# Altium PCB Phaser.PcbDoc (part 10 of 16)
Units mm, origin at the board's own origin, x right, y up, seen from the top; angles counter-clockwise.
Board outline 161.99 x 100 mm, 6 copper layers (TopLayer, MidLayer1, MidLayer2, SignalLayer1, Internal Plane 1, BottomLayer), stack 1.528 mm thick; 1017 components, 665 nets, 3453 pads, 2223 vias.
Unrouted connection lines stored in the file: 1.
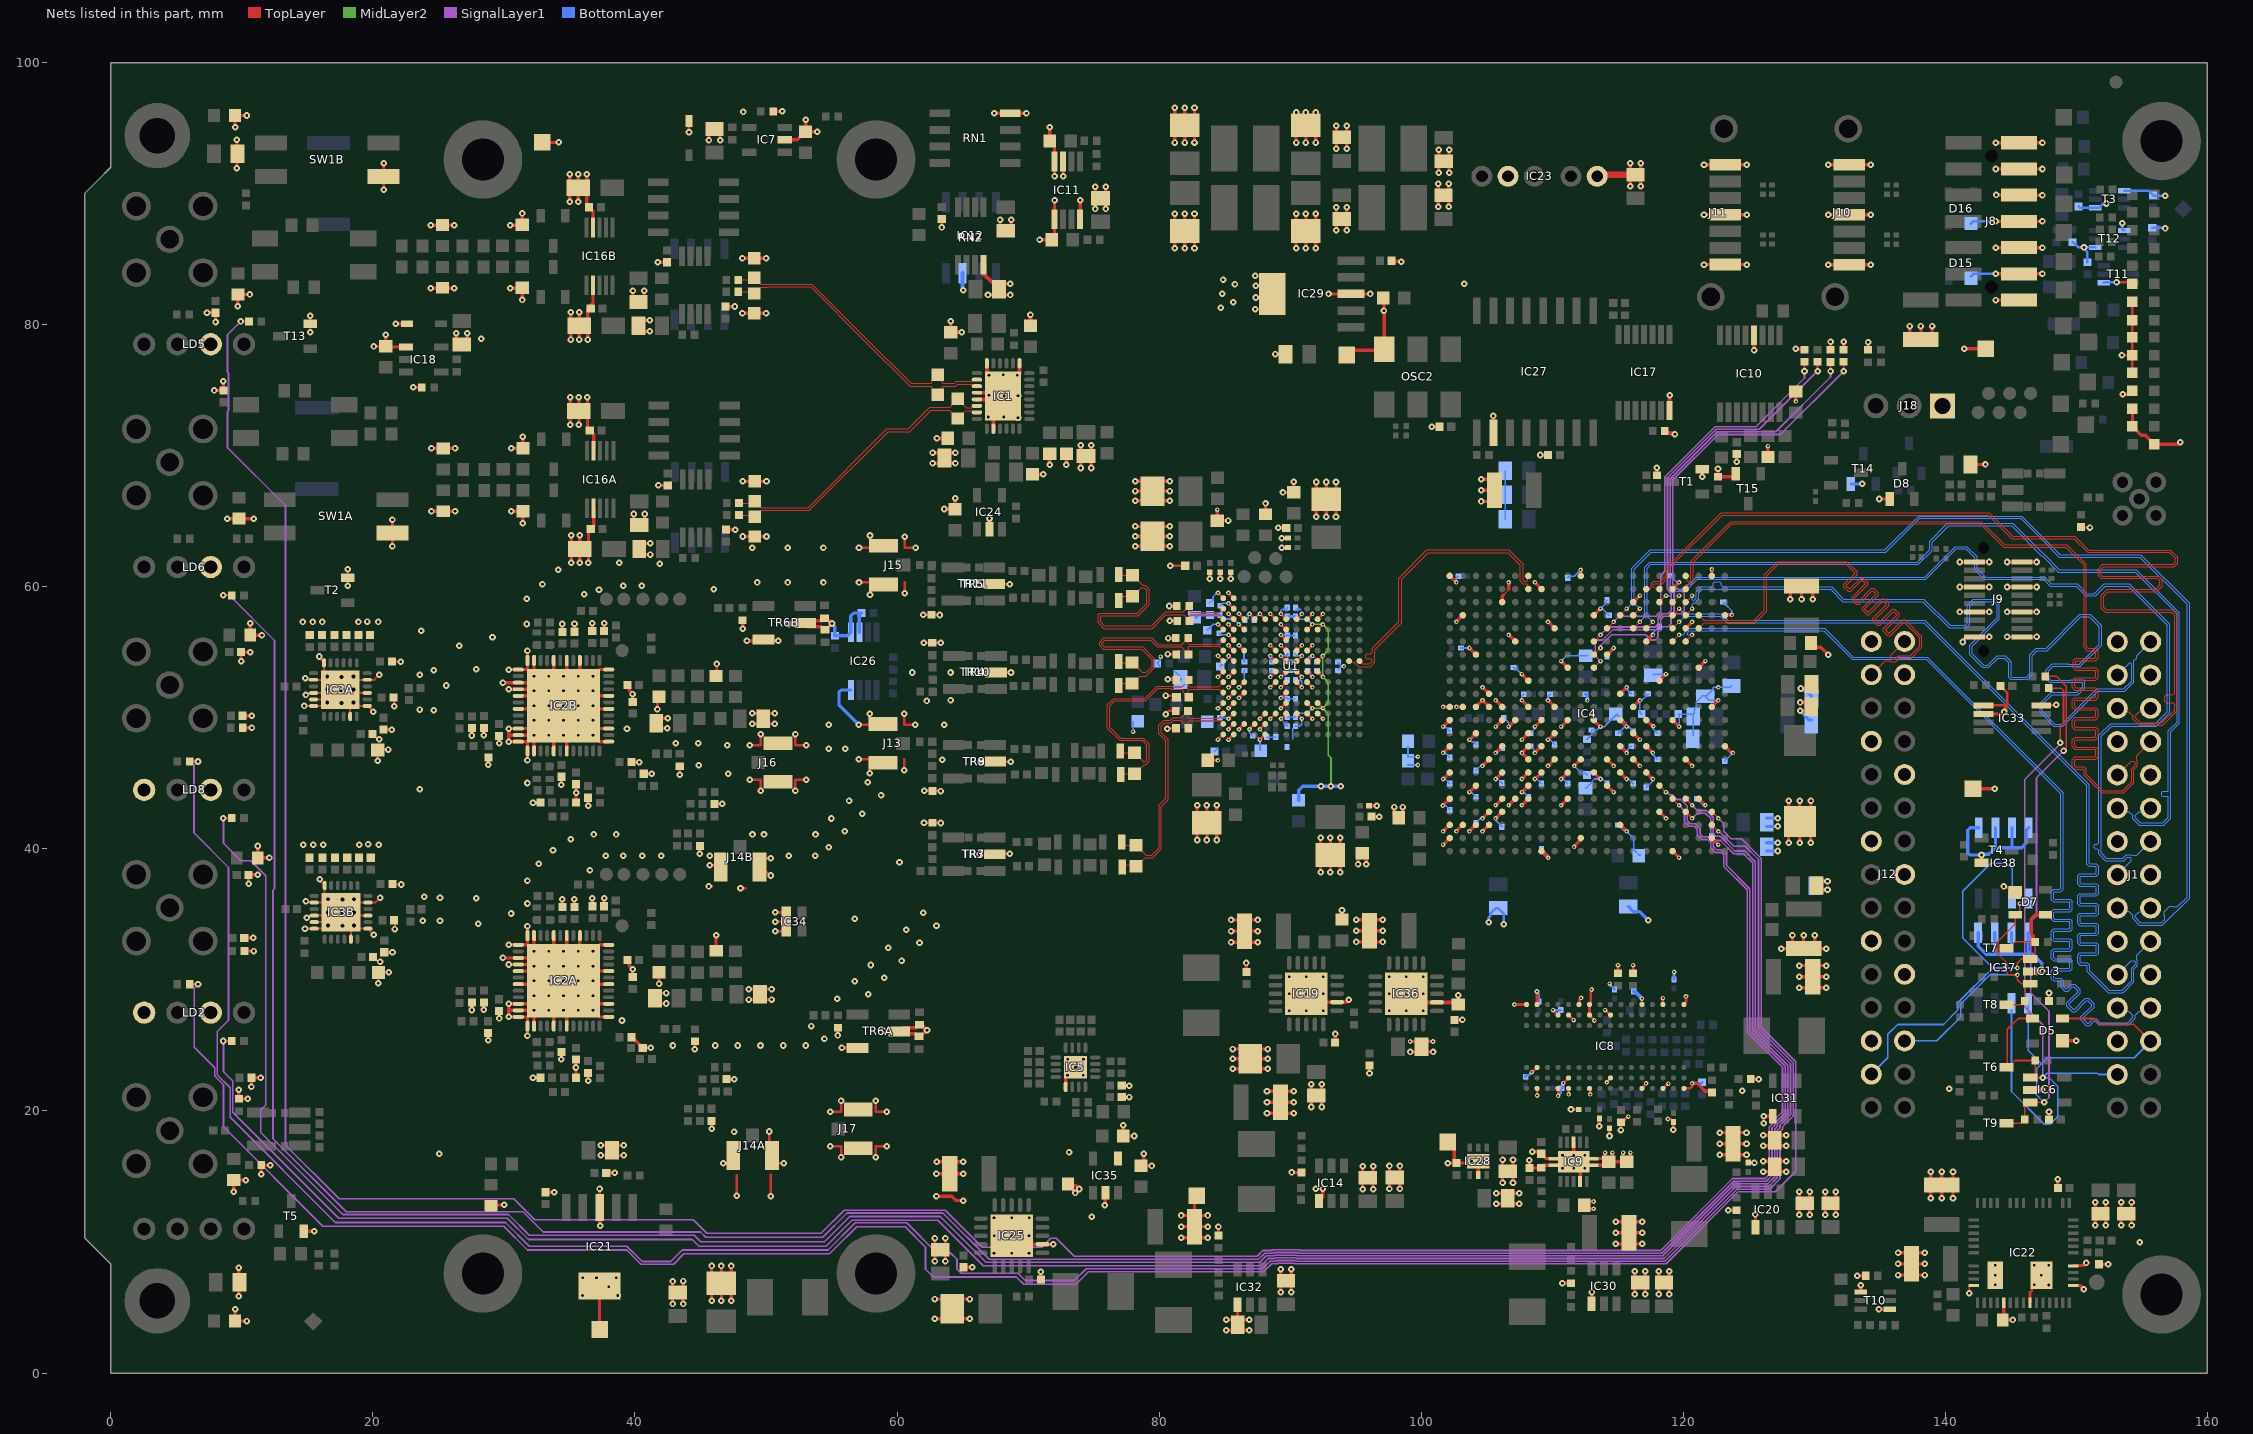
[diagram p12: the nets of this part, all layers, seen from the top]

## Via types
v1: diameter 0.5, hole 0.2, TopLayer to BottomLayer, tented both sides, 1374 vias
v2: diameter 0.35, hole 0.15, TopLayer to BottomLayer, tented both sides, 728 vias
v3: diameter 0.5, hole 0.2, TopLayer to BottomLayer, tented top, 96 vias
v4: diameter 0.6, hole 0.3, TopLayer to BottomLayer, 18 vias
v5: diameter 0.5, hole 0.2, TopLayer to BottomLayer, 5 vias
v6: diameter 0.35, hole 0.15, TopLayer to BottomLayer, 1 vias
v7: diameter 0.8, hole 0.5, TopLayer to BottomLayer, tented both sides, 1 vias

## Nets (pads, with @x,y where several pads share a name; then routed paths per layer and width w, separated by ;. In a path a pad name is that pad's centre, name@x,y a point inside that pad or via, vN(x,y) a via of type N, cw(c..) or ccw(c..) an arc to the next point about the centre after c; other vN are vias at no path point) (continued)
GND: (continued)
  BottomLayer w0.125: v2(78.018,48.945) C32.2@78.018,49.72 ; R35.2@80.053,53.945 R35.2@79.845,54.153 80.072,54.38 80.072,54.628 v2(80.113,54.669) ; C145.1@81.226,53.522 C145.1@81.565,53.184 ; C145.1@81.462,52.893 C145.1@81.489,52.921 ; C307.1@83.671,56.675 84.121,57.125 v2(84.493,57.125) ; C322.1@83.871,58.75 84.112,58.991 84.112,59.235 84.359,59.482 84.45,59.482 v2(84.493,59.525) ; C1009.1@84.213,47.421 C1009.1@84.438,47.646 ; v2@84.336,50.682 84.45,50.682 v2(84.493,50.725) ; C144.1@84.571,56.45 84.696,56.325 v2(85.293,56.325) ; C304.1@84.621,50 85.218,50 v2(85.293,49.925) ; C323.1@84.646,58.55 84.821,58.725 v2(85.293,58.725) ; C25.2@84.668,53.925 85.293,54.55 v2(85.293,54.725) ; v2(86.093,52.325) 86.505,52.737 86.505,53.634 C38.1@86.521,53.65 ; v2(86.093,55.525) 86.48,55.137 86.48,54.266 C143.1@86.521,54.225 ; C47.1@86.657,57.469 86.789,57.601 86.789,57.772 86.893,57.875 v2(86.893,57.925) ; 86.696,57.81 87.104,57.81 ; v2(86.893,49.125) 86.893,48.85 C308.1@87.143,48.6 ; C40.1@87.177,57.469 87.177,57.494 87.314,57.632 87.339,57.632 87.633,57.925 v2(87.693,57.925) ; 87.504,48.514 v2(87.693,48.325) 87.693,47.55 C309.1@87.743,47.5 ; v2(87.693,49.125) 87.693,49.111 88.218,48.586 C39.1@88.218,48.525 88.895,48.525 C300.1@88.9,48.52 ; v2(88.493,53.125) 88.493,53.546 C292.1@88.596,53.65 ; v2(88.493,54.725) 88.493,54.329 C298.1@88.596,54.225 ; v2(89.293,49.925) 89.293,49.875 C328.1@89.818,49.35 ; v2(89.293,51.525) 89.743,51.525 89.818,51.45 C317.1@90.343,51.45 ; v2(89.293,52.325) 89.293,52.35 C315.1@89.818,52.875 ; v2(89.293,53.125) 89.33,53.125 89.453,53.249 89.62,53.249 89.834,53.463 89.859,53.463 90.021,53.625 90.021,53.65 90.368,53.65 v2(90.893,53.125) ; v2(89.293,54.725) 89.643,54.725 89.818,54.9 89.818,54.404 89.859,54.362 89.859,54.337 89.996,54.2 C296.1@90.021,54.2 ; v2(89.293,56.325) 89.343,56.275 C312.1@90.346,56.275 ; v2(89.293,57.925) 89.293,58.189 89.366,58.262 89.68,58.262 89.818,58.4 C329.1@89.818,58.425 ; 90.203,48.357 90.203,49.114 90.205,49.116 C326.1@90.205,49.213 ; C326.1@90.343,49.35 90.738,49.35 90.893,49.505 v2(90.893,49.925) ; C311.1@90.346,52.875 90.819,52.875 90.893,52.802 v2(90.893,52.325) ; C318.1@90.346,54.9 90.521,54.725 v2(90.893,54.725) ; C325.1@90.484,58.262 90.798,58.262 ; 90.768,52.833 v2@90.768,53.241 ; v2(90.893,57.925) v2@90.893,57.973 ; C324.1@91.343,53.675 91.343,53.625 91.547,53.42 91.547,53.311 91.693,53.165 v2(91.693,53.125) ; C327.1@91.343,54.225 91.393,54.275 91.393,54.605 91.466,54.679 91.585,54.679 91.632,54.725 v2(91.693,54.725) ; 91.441,54.612 91.85,54.612 ; C316.1@93.643,53.675 93.893,53.925 v2@93.943,53.925 ; C310.1@93.643,54.225 v2@93.943,53.925 ; v2(94.093,53.925) v2@93.943,53.925 ; C148.1@98.989,46.399 v2(99.739,46.399) ; C57.1@98.989,47.775 98.989,47.026 v2(99.739,47.026) ; v2(101.651,43.307) 101.694,43.264 101.911,43.264 102.175,43 C115.1@102.175,42.975 ; v2(101.675,45.325) 101.825,45.325 C114.1@102.175,44.975 ; v2(101.675,47.325) 101.825,47.325 C97.1@102.175,46.975 ; v2(101.675,49.325) 101.825,49.325 C112.1@102.175,48.975 ; v2(102.675,60.325) 102.675,60.631 102.68,60.636 102.68,60.661 102.818,60.799 C207.1@102.843,60.799 ; C75.1@103.025,55.325 v2(103.675,55.325) ; v2(103.675,44.325) 103.825,44.325 C220.1@104.175,43.975 ; v2@103.689,48.325 103.887,48.127 104.038,48.127 C125.1@104.189,47.976 ; C116.1@104.175,41.975 104.525,42.325 v2(104.675,42.325) ; C113.1@104.175,45.975 104.525,46.325 v2(104.675,46.325) ; v2(105.675,42.325) 105.675,42.175 C90.1@106.175,41.675 ; v2(105.675,45.325) 105.825,45.325 C100.1@106.175,44.975 ; v2(105.675,47.325) 105.825,47.325 C124.1@106.175,47.675 ; C70.1@106.3,49.987 106.675,49.613 v2(106.675,49.325) ; C72.1@106.401,65.143 C71.1@106.401,68.859 ; C74.1@107.029,53.845 107.166,53.708 107.293,53.708 v2(107.675,53.325) ; v2(107.675,44.325) 107.825,44.325 C214.1@108.175,43.975 ; v2(107.675,51.325) 107.675,51.663 107.812,51.8 C117.1@107.825,51.8 ; C108.1@108.325,47.825 108.675,47.475 v2(108.675,47.325) ; C99.1@108.325,48.825 108.675,49.175 v2(108.675,49.325) ; v2(108.675,45.325) 108.825,45.325 C107.1@109.175,44.975 ; v2(108.829,29.113) 108.829,29.09 108.992,28.927 C167.1@108.992,28.353 ; C65.1@109.175,40.003 109.175,39.978 109.312,39.84 109.337,39.84 109.651,39.527 109.651,39.342 v2@109.69,39.303 ; v2(109.675,48.325) 109.825,48.325 C120.1@110.175,47.975 ; v2(109.675,51.325) 109.675,51.604 109.708,51.638 109.708,51.663 109.846,51.8 C118.1@109.871,51.8 ; v2(110.675,45.325) 110.825,45.325 C104.1@111.175,44.975 ; v2(110.675,54.325) 110.686,54.325 111.09,54.729 112.671,54.729 C233.1@112.675,54.725 ; C217.1@111.175,60.675 111.299,60.799 111.681,60.799 v2(112.169,61.287) ; v2(111.675,46.325) 112.226,45.774 112.506,45.774 R239.1@112.65,45.63 ; C60.1@112.525,44.625 112.575,44.625 112.988,45.038 112.988,45.088 113.225,45.325 v2(113.675,45.325) 113.825,45.325 C103.1@114.175,44.975 ; R238.1@112.65,48.37 112.67,48.37 112.898,48.597 112.898,48.617 113,48.72 C121.1@113,49.075 113.425,49.075 v2(113.675,49.325) 113.975,49.325 114.925,50.275 115.644,49.556 115.644,49.356 v2(115.675,49.325) ; C73.1@114.175,54.675 114.675,55.175 v2(114.675,55.325) ; C68.1@114.175,58.975 114.038,58.838 114.038,58.688 v2(113.675,58.325) 113.825,58.325 C62.1@114.325,57.825 ; C215.1@115.025,41.825 115.525,41.325 v2(115.675,41.325) 116.215,40.785 116.215,39.929 116.617,39.527 C240.1@116.716,39.527 ; C122.1@115.025,48.825 115.525,49.325 v2(115.675,49.325) ; v2(115.675,45.325) 115.825,45.325 C95.1@116.175,44.975 ; v2(115.675,47.325) 115.718,47.368 115.718,47.543 116,47.825 C106.1@116.025,47.825 ; v2(115.675,52.325) 115.675,52.175 C219.1@116.025,51.825 ; C119.1@116.175,48.975 115.825,49.325 v2(115.675,49.325) ; R48.1@116.83,50.275 116.675,50.43 v2(116.675,51.325) 116.85,51.325 C64.1@117.325,51.8 ; C79.1@117.175,44.675 117.675,45.175 v2(117.675,45.325) ; v2(117.675,47.325) 117.675,47.175 C105.1@118.025,46.825 ; v2(117.675,56.325) 117.675,56.475 C212.1@118.175,56.975 ; C82.1@117.7,53.275 117.75,53.325 v2(118.675,53.325) ; v2(117.706,49.352) 117.706,49.206 117.675,49.175 C102.1@118.025,48.825 ; C61.1@119.025,60.825 119.525,60.325 v2(119.675,60.325) ; v2(119.675,49.325) 119.675,50.22 R91.1@119.62,50.275 C96.1@120.752,50.275 ; C109.1@120.731,48.633 120.752,48.655 C96.1@120.752,50.275 ; C216.1@121.025,43.825 121.525,43.325 v2(121.675,43.325) ; C63.1@122.175,40.975 122.312,40.838 122.312,40.688 v2(122.675,40.325) ; v2(122.675,51.325) 121.977,51.325 C67.1@121.617,51.685 ; C210.1@123.025,58.825 123.05,58.825 123.188,58.688 123.188,58.663 123.706,58.144 v2(123.706,57.853) ; C208.1@123.165,46.68 123.165,46.705 123.774,47.314 v2(123.774,47.325) ; C66.1@123.675,52.425 123.575,52.325 v2(122.675,52.325) 122.327,52.325 122.254,52.252 122.254,52.148 121.792,51.685 C67.1@121.617,51.685 ; C96.1@120.752,50.275 120.825,50.348 120.825,50.621 120.997,50.793 120.997,51.223 121.459,51.685 C67.1@121.617,51.685
  BottomLayer w0.19: R209.1@149.708,86.296 149.728,86.296 150.136,85.888 v1(150.571,85.888) ; R203.1@150.165,89.014 150.269,88.91 151.702,88.91 151.975,89.183 152.225,89.183 v1(152.284,89.243) ; R222.1@150.825,84.773 150.825,85.55 150.571,85.804 v1(150.571,85.888) ; T12.4@151.435,85.888 v1(150.571,85.888) ; T11.4@152.087,83.195 152.111,83.219 153.031,83.219 v1(153.054,83.243) ; v1(153.493,87.736) 153.493,87.293 153.598,87.188 T12.1@153.635,87.188 ; T3.1@153.627,90.21 155.489,90.21 155.825,89.875 R177.1@155.845,89.875 155.887,89.833 v1(156.782,89.833) ; R206.1@155.778,87.388 156.731,87.388 v1(156.782,87.338)
  BottomLayer w0.2: v1(105.14,34.403) 105.154,34.417 105.154,34.767 105.265,34.878 105.265,35.053 105.69,35.478 C87.1@105.865,35.478 106.29,35.053 v1(106.29,34.253) ; C166.1@107.947,22.611 107.947,22.636 108.047,22.736 108.203,22.736 v2(108.429,22.963) ; v2(110.065,27.696) C165.1@110.647,27.696 ; v2(110.441,21.154) 110.638,21.351 110.638,21.647 C170.1@110.715,21.724 110.811,21.82 110.811,22.09 v2(110.84,22.119) ; v2@114.38,29.663 C164.1@114.74,29.303 ; C168.1@119.29,30.028 v2(119.29,30.603) ; v2(120.665,22.103) 121.329,22.103 R124.1@121.42,22.194 ; D15.1@141.943,83.679 142.139,83.875 v1(143.85,83.875) ; D16.1@141.943,87.704 142.114,87.875 v1(143.85,87.875)
  BottomLayer w0.25: v1(55.037,57.191) 55.037,57.145 55.253,56.929 R178.1@55.253,56.264 56.218,56.264 IC26.5@56.473,56.519 56.473,57.769 56.698,57.994 C48.1@57.298,57.994 57.223,57.919 57.123,57.919 IC26.6@57.123,56.519 ; IC26.4@56.473,52.119 55.727,52.119 55.58,51.972 55.58,50.963 v1(57.076,49.466) ; v1(80.67,52.934) 81.609,52.934 C145.1@81.627,52.916 ; C213.1@115.79,35.603 116.18,35.213 116.655,35.213 v1(117.315,34.553) ; C76.1@126.365,39.835 v1(127.19,39.835) ; C76.1@126.365,40.471 v1(127.19,40.471) ; C77.1@126.365,41.709 v1(127.19,41.709) ; C77.1@126.365,42.345 v1(127.19,42.345) ; v1(128.925,50.532) 129.201,50.256 129.204,50.256 129.35,50.109 129.35,50.075 129.6,49.825 C92.1@129.75,49.825 ; v1(128.925,51.168) 129.443,51.168 C110.1@129.775,51.5 129.775,51.675 129.375,52.075 129.2,52.075 129.091,52.184 128.998,52.184 v1(128.95,52.232) ; C111.1@130.075,37.175 130.368,36.882 v1(131,36.882) ; C111.1@130.368,37.518 v1(131,37.518) ; T14.2@132.788,67.843 v5(133.652,67.843) ; IC37.1@142.495,33.606 142.495,32.564 143.095,31.964 145.085,31.964 ; IC38.1@142.545,41.609 141.875,41.609 141.7,41.434 141.7,39.676 141.846,39.53 v1(142.75,39.53) 142.798,39.578 143.303,39.578 143.815,40.09 ; IC37.2@143.765,33.606 143.765,31.999 143.8,31.964 ; IC38.2@143.815,41.609 143.815,40.09 ; IC37.3@145.035,33.606 145.035,32.014 145.085,31.964 ; IC38.3@145.085,41.609 145.072,41.597 145.072,40.09 ; IC37.4@146.305,33.606 146.305,32.154 146.495,31.964 ; IC38.4@146.355,41.609 146.18,41.434 146.18,40.459 145.811,40.09 145.072,40.09 ; v1(147.375,30.65) 147.36,30.665 147.36,31.275 146.671,31.964 146.495,31.964 ; 143.815,40.09 145.072,40.09 ; 145.085,31.964 146.495,31.964
  BottomLayer w0.254: C98.1@112.557,51.801 112.582,51.801 112.655,51.728 112.655,51.703 112.657,51.702 112.657,51.343 v2(112.675,51.325)
  BottomLayer w0.3: v1@65,82.605 RN2.7@65,83.93 ; C162.1@116.215,29.103 116.308,29.103 v2(116.841,28.57)
  other v1: 35.997,5.917 38.699,5.917 38,6.575 42.88,6.989 36.025,7.262 37.069,7.262 38.567,7.262 154.836,9.969 74.861,11.923 91.95,14.06 103.853,16.162 104.853,16.162 25.083,16.725 73.125,16.85 47.563,18.407 126.144,19.062 124.495,21.541 140.275,21.7 42.901,24.994 46.126,24.991 47.854,24.991 49.581,24.991 51.308,24.991 53.035,24.991 54.463,25.494 53.447,26.478 39.014,26.899 55.441,28.568 57.79,28.917 56.774,29.901 59.022,30.15 39.835,30.815 58.006,31.134 60.343,31.471 59.327,32.455 61.715,32.842 60.699,33.826 63.01,34.138 28.034,34.271 23.8,34.519 25.125,34.519 56.774,34.669 30.547,35.064 61.994,35.122 31.8,35.827 14.898,36.014 27.881,36.241 25.125,36.279 23.925,36.348 31.8,37.554 36.569,38.354 32.668,38.862 60.19,38.987 51.74,39.472 37.784,39.479 39.116,39.479 40.573,39.479 42.012,39.479 45.718,39.479 53.746,39.479 33.75,39.903 54.793,40.112 14.704,40.314 15.454,40.314 16.204,40.314 18.954,40.314 20.454,40.314 19.636,40.346 35.103,40.742 36.855,41.097 38.583,41.097 48.971,41.097 49.85,41.097 53.777,41.095 56.012,41.331 62.059,41.979 63.332,41.969 54.996,42.315 57.353,42.672 56.337,43.656 58.781,44.099 62.075,44.417 63.348,44.407 23.592,44.542 31.8,45.023 57.765,45.083 47.117,45.729 44.856,46.373 63.454,46.787 54.788,47.625 56.058,47.643 47.045,47.905 43.104,48.057 44.831,48.057 39.395,49.175 80.621,49.166 54.788,49.454 63.602,49.466 80.518,50.267 24.658,50.568 23.592,50.626 62.255,51.283 64.084,51.333 25.601,52.463 14.848,53.01 23.592,53.275 61.163,53.455 64.084,53.455 24.658,53.627 27.881,53.697 26.598,55.499 63.323,55.723 62.05,55.733 80.705,56.084 29.133,56.136 23.706,56.631 31.746,57.157 14.654,57.31 15.404,57.31 16.154,57.31 18.904,57.31 20.404,57.31 19.586,57.342 80.806,57.396 61.997,57.853 63.27,57.843 80.776,58.527 31.738,59.072 36.129,59.43 37.26,59.769 46.025,59.817 39.104,60.062 40.534,60.064 32.945,60.177 49.33,60.325 51.67,60.326 54.385,60.326 34.152,61.282 80.833,61.605 41.904,61.756 38.79,61.836 48.956,62.966 51.67,62.966 54.385,62.966 69.228,72.898 66.968,72.949 68.136,72.949 68.187,74.574 69.228,74.574 67.019,74.6 67.019,76.149 69.178,76.149 68.111,76.175 28.284,78.908 64.93,79.422 87.323,81.159 84.688,81.284 85.657,81.72 87.363,82.068 84.814,82.367 65.05,82.612 87.363,82.956 85.784,83.089 103.272,83.125 84.876,83.421 87.337,83.736 48.275,96.225
  other v2: 117.164,22.101 114.38,29.713 109.69,39.304 103.675,48.325
  other v3: 147.878,6.721 143.8,6.739 146.77,6.739 143.8,7.475 147.313,7.475 146.763,8.221 147.878,8.228 143.8,8.237 67.4,9.144 68.75,9.144 70.068,9.144 67.432,10.461 70.068,10.489 67.4,11.836 68.746,11.836 70.092,11.836 110.778,15.612 111.628,15.612 112.478,15.612 110.778,16.612 111.628,16.612 112.478,16.612 73.003,22.717 74.207,22.733 73.013,23.952 74.232,23.952 89.929,27.647 91.228,27.647 92.528,27.647 97.55,27.64 98.85,27.639 100.15,27.639 32.3,27.675 33.425,27.675 34.55,27.675 35.675,27.675 36.8,27.675 32.3,28.8 33.425,28.8 34.55,28.8 35.675,28.8 36.8,28.8 89.929,28.947 92.529,28.947 97.55,28.94 100.15,28.939 32.3,29.925 33.425,29.925 35.675,29.925 36.8,29.925 89.929,30.247 91.229,30.247 92.529,30.247 97.55,30.24 98.85,30.239 100.15,30.239 32.3,31.05 33.425,31.05 34.55,31.05 35.675,31.05 36.8,31.05 32.3,32.175 33.425,32.175 34.55,32.175 35.675,32.175 36.8,32.175 32.3,48.675 33.425,48.675 34.55,48.675 35.675,48.675 36.8,48.675 32.3,49.8 33.425,49.8 34.55,49.8 35.675,49.8 36.8,49.8 32.3,50.925 33.425,50.925 34.55,50.925 35.675,50.925 36.8,50.925 32.3,52.05 33.425,52.05 34.55,52.05 35.675,52.05 36.8,52.05 32.3,53.175 33.425,53.175 34.55,53.175 35.675,53.175 36.8,53.175
  other v4: 17.675,34.129 18.575,34.154 16.575,35.154 18.575,35.154 17.675,36.129 18.575,36.154 17.625,51.125 18.525,51.15 16.525,52.15 18.525,52.15 17.625,53.125 18.525,53.15
hs: IC35.4
HW_REV0: IC4.N18 R261.1 | length 30.1
  TopLayer w0.095: IC4.N18@114.175,56.825 v2(114.675,57.325)
  TopLayer w0.127: v1(129.246,76.441) R261.1@129.246,77.151
  SignalLayer1 w0.125: v2(114.675,57.325) 115.084,57.734 117.932,57.734 118.266,58.068 118.266,60.885 118.593,61.212 118.593,68.401 122.41,72.218 125.538,72.218 129.246,75.925 v1(129.246,76.441)
HW_REV1: IC4.M17 R235.1 | length 32.9
  TopLayer w0.125: IC4.M17@113.175,55.825 v2(113.675,56.325)
  TopLayer w0.127: v1(130.241,76.441) R235.1@130.241,77.151
  SignalLayer1 w0.125: v2(113.675,56.325) 114.279,56.929 117.844,56.929 118.086,57.171 118.086,57.604 118.419,57.938 118.836,57.938 119.086,58.188 119.086,59.47 118.795,59.762 118.795,68.318 122.493,72.016 125.796,72.016 129.108,75.328 130.221,76.441 v1(130.241,76.441)
HW_REV2: IC4.M15 R242.1 | length 36.4
  TopLayer w0.125: IC4.M15@113.175,53.825 v2(113.675,54.325)
  TopLayer w0.127: v1(131.231,76.436) R242.1@131.231,77.147
  SignalLayer1 w0.125: v2(113.675,54.325) 113.288,54.713 113.288,55.747 113.478,55.938 113.836,55.938 114.626,56.728 117.928,56.728 118.288,57.088 118.288,57.521 118.503,57.736 118.919,57.736 119.288,58.105 119.288,59.554 118.996,59.845 118.996,68.235 122.576,71.815 127.04,71.815 131.231,76.006 v1(131.231,76.436)
HW_REV3: IC4.M16 R243.1 | length 36.8
  TopLayer w0.125: IC4.M16@113.175,54.825 v2(113.675,55.325)
  TopLayer w0.127: v1(132.231,76.441) R243.1@132.231,77.151
  SignalLayer1 w0.125: v2(113.675,55.325) 113.675,55.489 114.511,56.325 117.127,56.325 117.515,55.938 117.836,55.938 118.063,56.165 118.063,56.579 118.422,56.938 118.836,56.938 119.063,57.165 119.063,57.595 119.405,57.938 119.836,57.938 120.063,58.165 120.063,59.486 119.836,59.713 119.688,59.713 119.197,60.203 119.197,68.151 122.66,71.614 127.404,71.614 v1(132.231,76.441)
I2C_SCL0: D5.3 IC6.1 IC37.6 J1.27 R144.2 R175.1 T6.3 | length 63.8
  TopLayer w0.125: T6.3@144.65,23.35 T6.3@144.725,23.35 ; D5.3@146.639,27.053 145.553,27.053 144.725,26.225 T6.3@144.725,23.35 ; v1(147.425,22.544) 146.481,22.544 IC6.1@146.475,22.55 146.696,22.55 146.855,22.709 R144.2@146.855,23.85 145.3,23.85 144.8,23.35 T6.3@144.725,23.35 ; R175.1@147.874,52.261 147.874,52.248 148.85,52.248 149.011,52.087 149.011,49.64 148.763,49.391 v1(148.763,48.085)
  SignalLayer1 w0.125: v1(147.425,22.544) 147.425,26.585 146.059,27.951 146.059,45.29 148.763,47.993 v1(148.763,48.085)
  BottomLayer w0.125: IC37.6@145.035,28.206 145.035,21.481 147.536,18.98 147.98,18.98 148.577,19.577 148.577,21.868 147.901,22.544 v1(147.425,22.544) 147.756,22.875 151.6,22.875 151.697,22.778 J1.27@153.114,22.778
I2C_SCL1: D7.3 IC13.1 IC38.6 J12.27 R149.2 T7.3 | length 38.4
  TopLayer w0.125: T7.3@144.65,32.4 144.8,32.4 145.3,32.9 R149.2@146.855,32.9 146.855,31.759 146.696,31.6 IC13.1@146.475,31.6 145.805,31.6 145.485,31.28 v2(145.485,30.906)
  TopLayer w0.25: R149.2@146.855,32.9 146.691,33.064 146.691,33.366 146.554,33.503 146.554,34.658 146.869,34.973 D7.3@147.625,34.973
  BottomLayer w0.125: J12.27@134.344,22.804 135.6,24.06 135.6,25.85 136.35,26.6 139.85,26.6 140.947,27.697 140.947,28.25 143.603,30.906 ; IC38.6@145.085,36.209 145.085,38.472 144.648,38.909 143.451,38.909 141.316,36.774 141.316,33.194 143.603,30.906 ; v2(145.485,30.906) 143.603,30.906
I2C_SDA0: D5.2 IC6.3 IC37.5 J1.26 R142.2 R179.1 T9.3 | length 64.6
  TopLayer w0.125: T9.3@144.65,19.05 145.755,19.05 R142.2@146.055,19.35 146.055,20.525 146.18,20.65 IC6.3@146.475,20.65 v1(147.525,20.65) ; R179.1@147.612,53.162 148.472,53.162 149.225,52.409 149.225,47.691 v1(149.011,47.477) ; D5.2@148.939,27.053 151.322,27.053 151.752,26.623 154.35,26.623 J1.26@155.654,25.318
  SignalLayer1 w0.125: v1@147.55,20.675 147.9,21.025 147.9,27.615 146.495,29.02 146.495,34.423 146.95,34.878 146.95,45.416 v1(149.011,47.477)
  BottomLayer w0.125: IC37.5@146.305,28.206 146.305,24.621 147.325,23.601 ; v1(147.525,20.65) 146.913,21.263 146.913,21.792 146.963,21.842 146.963,23.238 147.325,23.601 ; J1.26@155.654,25.318 154.396,24.06 147.784,24.06 147.325,23.601
I2C_SDA1: D7.2 IC13.3 IC38.5 J12.26 R148.2 T8.3 | length 23.6
  TopLayer w0.125: T8.3@144.65,28.1 145.755,28.1 R148.2@146.055,28.4 146.055,29.575 IC13.3@146.18,29.7 ; 145.485,30.195 145.485,30.015 145.8,29.7 IC13.3@146.18,29.7 ; v2(145.485,30.376) 144.842,30.376 144.654,30.564 144.654,31.331 143.974,32.012 143.974,32.919 145.325,34.271 D7.2@145.325,34.973 145.443,34.973 145.681,35.21 v6(145.681,35.817) ; IC13.3@146.475,29.7 IC13.3@146.18,29.7
  BottomLayer w0.125: J12.26@136.884,25.344 139.344,25.344 141.161,27.161 141.161,28.161 143.4,30.4 145.461,30.4 v2(145.485,30.376) ; v6(145.681,35.817) 146.118,35.817 146.355,36.055 IC38.5@146.355,36.209
IN_0_N: C224B.2 C226B.2 IC1.2 R97B.2 | length 22.6
  TopLayer w0.095: R97B.2@47.895,83.423 C224B.2@49.254,83.423 ; C224B.2@49.104,83.573 C224B.2@49.254,83.423 ; IC1.2@66.1,75.8 65.85,75.8 65.71,75.66 64.528,75.66 64.391,75.523 63.504,75.523 63.449,75.578 63.449,75.808 C226B.2@63.094,76.163 62.666,75.735 62.666,75.578 62.61,75.523 61.069,75.523 60.892,75.7 57.811,78.78 53.499,83.092 50.001,83.092 49.991,83.083 49.587,83.083 49.532,83.138 49.532,83.145 C224B.2@49.254,83.423
IN_0_P: C226B.1 C227B.1 IC1.3 R58B.2 | length 22.6
  TopLayer w0.095: R58B.2@47.895,82.523 C227B.1@49.254,82.523 ; C227B.1@49.104,82.373 C227B.1@49.254,82.523 ; IC1.3@66.1,75.3 65.85,75.3 65.71,75.44 64.619,75.44 64.482,75.303 63.504,75.303 63.449,75.247 63.449,75.018 C226B.1@63.094,74.663 62.666,75.09 62.666,75.247 62.61,75.303 60.977,75.303 60.8,75.48 57.591,78.689 53.408,82.872 50.092,82.872 50.083,82.863 49.587,82.863 49.532,82.807 49.532,82.8 C227B.1@49.254,82.523
IN_1_N: C226A.1 C227A.1 IC1.7 R58A.2 | length 22.2
  TopLayer w0.095: R58A.2@47.945,65.462 C227A.1@49.269,65.462 ; C227A.1@49.14,65.333 C227A.1@49.269,65.462 ; IC1.7@66.1,73.3 65.832,73.3 65.689,73.443 65.227,73.443 C226A.1@64.618,72.834 63.978,73.474 62.596,73.474 60.954,71.831 59.323,71.831 53.314,65.823 49.623,65.823 49.568,65.767 49.568,65.761 C227A.1@49.269,65.462
IN_1_P: C224A.2 C226A.2 IC1.6 R97A.2 | length 22.3
  TopLayer w0.095: R97A.2@47.945,66.362 C224A.2@49.311,66.362 ; C224A.2@49.14,66.533 C224A.2@49.311,66.362 ; IC1.6@66.1,73.8 65.832,73.8 65.695,73.663 65.289,73.663 C226A.2@64.618,74.334 64.19,73.906 64.19,73.873 64.168,73.851 64.168,73.843 64.018,73.694 62.505,73.694 60.863,72.051 59.232,72.051 53.223,66.043 49.623,66.043 49.568,66.099 49.568,66.106 C224A.2@49.311,66.362
IOUTA_N: C136.1 L12.1 R12.1 R258.1 U1.C14 | length 19.4
  TopLayer w0.095: L12.1@77.144,40.507 77.144,40.301 77.181,40.264 C136.1@78.244,40.264 78.269,40.264 79.022,39.511 79.437,39.511 79.991,40.065 79.991,43.348 80.518,43.875 80.518,48.25 79.989,48.779 79.989,49.428 80.381,49.819 80.849,49.819 81.027,49.997 81.699,49.997 R258.1@82.203,50.5 ; R258.1@82.203,50.52 R258.1@82.203,50.5 ; U1.C14@84.893,50.325 84.54,49.972 82.259,49.972 82.203,50.028 R258.1@82.203,50.5
IOUTA_P: C136.2 L6.1 R11.1 R184.1 U1.B14 | length 19.3
  TopLayer w0.095: L6.1@77.185,38.625 77.185,38.787 78.121,38.787 C136.2@78.244,38.664 78.269,38.664 78.933,39.327 79.513,39.327 80.175,39.989 80.175,43.215 80.702,43.741 80.702,48.326 80.173,48.855 80.173,49.351 80.457,49.635 80.926,49.635 81.103,49.813 81.63,49.813 R184.1@82.223,49.22 ; R11.1@82.223,49.2 R184.1@82.223,49.22 ; U1.B14@84.893,49.525 84.629,49.789 82.346,49.789 82.223,49.666 R184.1@82.223,49.22
IOUTB_N: C49.1 L23.1 R15.1 R264.1 U1.E14 | length 19.3
  TopLayer w0.095: L23.1@77.084,45.675 77.132,45.723 C49.1@78.121,45.723 78.146,45.723 78.854,46.431 78.979,46.431 79.231,46.683 79.231,47.996 78.772,48.455 77.06,48.455 76.227,49.288 76.227,50.912 76.599,51.284 78.971,51.284 79.924,52.238 80.875,52.238 80.938,52.175 81.716,52.175 81.83,52.061 81.83,51.959 82.207,51.582 R15.1@82.207,51.562 82.207,52.092 82.304,52.189 84.629,52.189 U1.E14@84.893,51.925
IOUTB_P: C49.2 L1.1 R13.1 R263.1 U1.F14 | length 19.3
  TopLayer w0.095: L1.1@77.016,47.476 77.016,47.377 77.076,47.317 78.115,47.317 C49.2@78.121,47.323 78.146,47.323 78.81,46.66 78.947,46.66 79.047,46.76 79.047,47.92 78.696,48.271 76.983,48.271 76.043,49.212 76.043,50.989 76.523,51.468 78.895,51.468 79.848,52.422 80.994,52.422 81.057,52.359 81.761,52.359 82.255,52.852 R263.1@82.255,52.872 82.255,52.428 82.31,52.372 84.54,52.372 U1.F14@84.893,52.725
IOUTC_N: C141.1 L39.1 R21.1 R266.1 U1.K14 | length 18.9
  TopLayer w0.095: L39.1@76.908,54.294 76.908,54.204 77.915,54.204 C141.1@77.927,54.216 77.952,54.216 78.705,53.464 79.017,53.464 79.458,53.904 79.458,54.44 78.66,55.238 75.739,55.238 75.454,55.522 75.454,55.767 75.775,56.088 79.429,56.088 79.932,55.585 81.738,55.585 82.212,56.059 R266.1@82.212,56.079 82.212,55.681 82.268,55.626 84.594,55.626 U1.K14@84.893,55.925
IOUTC_P: C141.2 L36.1 R16.1 R265.1 U1.J14 | length 19.1
  TopLayer w0.095: L36.1@76.908,52.47 77.054,52.616 C141.2@77.927,52.616 77.952,52.616 78.514,53.178 78.992,53.178 79.642,53.828 79.642,54.517 78.737,55.422 75.815,55.422 75.638,55.598 75.638,55.691 75.851,55.904 79.353,55.904 79.856,55.401 81.677,55.401 82.24,54.838 R265.1@82.24,54.818 82.24,55.386 82.295,55.442 84.576,55.442 U1.J14@84.893,55.125
IOUTD_N: C379.1 L55.1 R31.1 R268.1 U1.M14 | length 19.4
  TopLayer w0.095: L55.1@76.925,58.938 76.925,59.024 77.162,59.262 C379.1@77.963,59.262 77.988,59.262 78.651,59.925 78.859,59.925 79.066,59.718 79.066,58.705 78.334,57.973 75.45,57.973 75.342,57.866 75.342,57.243 75.791,56.794 79.466,56.794 80.516,57.844 81.881,57.844 82.313,57.411 R268.1@82.313,57.391 82.313,57.822 82.369,57.877 84.54,57.877 U1.M14@84.893,57.525
IOUTD_P: C379.2 L53.1 R24.1 R267.1 U1.N14 | length 19.1
  TopLayer w0.095: L53.1@76.925,60.942 77.012,60.855 77.018,60.862 C379.2@77.963,60.862 77.988,60.862 78.74,60.109 78.935,60.109 79.25,59.794 79.25,58.629 78.41,57.79 75.582,57.79 75.526,57.734 75.526,57.319 75.806,57.04 79.452,57.04 80.487,58.075 81.857,58.075 82.283,58.502 R267.1@82.283,58.522 82.333,58.472 82.333,58.125 82.396,58.061 84.629,58.061 U1.N14@84.893,58.325
IOVDD25: C322.2 C323.2 L7.1 U1.L12 | length 4.2
  TopLayer w0.2: v2(86.07,57.125) 86.081,57.125 86.481,56.725 U1.L12@86.493,56.725
  BottomLayer w0.125: C323.2@84.646,57.85 84.959,57.537 85.68,57.537 86.07,57.148 v2(86.07,57.125)
  BottomLayer w0.25: L7.1@82.809,57.665 82.994,57.85 C322.2@83.871,57.85 C323.2@84.646,57.85
IOVDD33: C324.2 C325.2 C326.2 C327.2 C328.2 C329.2 L41.1 U1.D5 U1.D6 U1.G5 U1.H5 U1.L5 U1.L6 | length 28.3
  TopLayer w0.2: U1.D6@91.293,51.125 v2(91.693,50.725) ; U1.L6@91.293,56.725 v2(91.693,57.125) ; U1.D5@92.093,51.125 v2(92.493,50.725) ; U1.G5@92.093,53.525 v2(92.493,53.125) ; U1.H5@92.093,54.325 v2(92.493,54.725) ; U1.L5@92.093,56.725 v2(92.493,57.125)
  MidLayer2 w0.125: v2(91.693,50.725) v2(92.493,50.725) ; v2(91.693,57.125) v2(92.493,57.125) 92.905,56.712 92.905,55.137 v2(92.493,54.725) v2(92.493,53.125) 92.905,52.712 92.905,51.137 v2(92.493,50.725) ; v1@93.11,44.592 93.11,46.956 92.905,47.161 92.905,50.312 v2(92.493,50.725)
  BottomLayer w0.125: C328.2@89.818,50.05 90.343,50.05 90.63,50.337 91.305,50.337 v2(91.693,50.725) ; C325.2@90.346,57.725 90.546,57.525 91.293,57.525 v2(91.693,57.125) ; C324.2@92.043,53.675 92.493,53.225 v2(92.493,53.125) ; C327.2@92.043,54.225 92.493,54.675 v2(92.493,54.725)
  BottomLayer w0.25: C329.2@89.818,57.725 C325.2@90.346,57.725 ; L41.1@90.645,43.705 90.645,44.463 90.963,44.78 v1(92.351,44.78) v1(93.101,44.78) v1(93.851,44.78)
ISTR_PARITYAB_N: IC4.G22 U1.H1 | length 21.9
  TopLayer w0.095: U1.H1@95.297,54.325 95.515,54.106 96.036,54.106 96.247,54.318 96.247,54.378 96.247,54.425 96.152,54.52 95.837,54.52 95.78,54.577 95.78,54.843 95.837,54.9 96.152,54.9 96.247,54.995 96.247,55.148 96.247,55.3 98.28,57.334 98.28,60.662 100.438,62.82 106.678,62.82 107.781,61.716 107.781,60.493 107.839,60.435 108.055,60.435 108.128,60.507 108.128,60.778 IC4.G22@108.175,60.825
ISTR_PARITYAB_P: IC4.G21 U1.H2 | length 22
  TopLayer w0.095: U1.H2@94.493,54.325 94.561,54.257 94.85,54.257 95.22,53.886 96.127,53.886 96.467,54.226 96.467,55.209 98.5,57.243 98.5,60.571 100.529,62.6 106.587,62.6 107.561,61.625 107.561,60.402 107.748,60.215 108.055,60.215 108.128,60.143 108.128,59.872 IC4.G21@108.175,59.825
LED0: IC4.V5 R28.1 | length 220.5
  TopLayer w0.125: IC4.V5@119.175,43.825 v2(119.675,43.325)
  TopLayer w0.127: v1(9.925,80.241) R28.1@10.555,80.241
  SignalLayer1 w0.127: v1(9.925,80.241) 8.915,79.232 8.915,76.377 8.991,76.302 8.991,73.447 8.915,73.372 8.915,70.612 13.334,66.194 13.334,17.384 17.426,13.291 30.756,13.291 32.358,11.688 44.443,11.688 45.476,10.656 54.199,10.656 55.971,12.428 63.675,12.428 66.495,9.607 71.052,9.607 71.733,10.288 72.147,10.288 73.522,8.914 87.476,8.914 87.916,9.354 88.612,9.354 88.662,9.404 90.688,9.404 90.738,9.354 118.267,9.354 123.754,14.841 126.246,14.841 126.564,15.158 126.564,18.777 126.767,18.98 126.767,19.154 127.564,19.951 127.564,23.323 124.875,26.011 124.875,36.865 123.083,38.656 123.083,39.533 122.902,39.713 122.45,39.713 122.083,40.08 122.083,40.466 121.836,40.713 121.405,40.713 121.064,41.055 121.064,41.486 120.836,41.713 120.45,41.713 120.083,42.08 120.083,42.917 v2(119.675,43.325)
LED1: IC4.U6 R30.1 | length 201.7
  TopLayer w0.125: IC4.U6@118.175,44.825 v2(118.675,44.325)
  TopLayer w0.127: v1(8.6,59.338) R30.1@9.23,59.338
  SignalLayer1 w0.127: v1(8.6,59.338) 9.06,59.338 12.502,55.896 12.502,36.947 12.384,36.829 12.384,17.88 17.962,12.302 31.457,12.302 32.998,10.761 44.997,10.761 45.408,10.351 54.325,10.351 56.187,12.213 63.488,12.213 67.028,8.673 87.576,8.673 88.053,9.151 88.696,9.151 88.746,9.201 90.604,9.201 90.654,9.151 118.351,9.151 123.838,14.638 126.331,14.638 126.767,15.074 126.767,18.693 126.97,18.896 126.97,19.07 127.767,19.867 127.767,23.407 125.078,26.096 125.078,36.949 123.287,38.741 123.287,39.617 122.987,39.917 122.534,39.917 122.287,40.164 122.287,40.55 121.92,40.917 121.489,40.917 121.267,41.139 121.267,41.57 120.92,41.917 120.534,41.917 120.287,42.164 120.287,43.263 119.786,43.763 119.514,43.763 119.162,44.116 118.944,44.116 118.735,44.325 v2(118.675,44.325)
LED2: IC4.AA3 R152.1 | length 189.8
  TopLayer w0.125: IC4.AA3@122.175,41.825 v2(122.675,41.325)
  TopLayer w0.127: R152.1@6.03,46.662 v1(6.66,46.662)
  SignalLayer1 w0.127: v1(6.66,46.662) 6.35,46.352 6.35,41.217 8.991,38.576 8.991,26.916 8.135,26.06 8.135,22.745 9.112,21.769 9.112,19.514 17.134,11.492 30.12,11.492 31.928,9.684 39.381,9.684 40.554,8.512 42.746,8.512 43.616,9.382 54.727,9.382 56.805,11.46 60.731,11.46 63.007,9.183 64.07,9.183 64.579,8.674 64.579,7.925 64.893,7.612 69.231,7.612 69.787,7.056 73.534,7.056 74.429,7.951 87.875,7.951 88.466,8.541 88.948,8.541 88.999,8.592 90.351,8.592 90.402,8.541 118.603,8.541 124.09,14.028 126.583,14.028 127.376,14.821 127.376,18.44 127.58,18.644 127.58,18.817 128.376,19.614 128.376,23.659 125.735,26.3 125.735,39.183 124.723,40.195 123.86,40.195 122.729,41.325 v2(122.675,41.325)
LED3: IC4.W4 R234.1 | length 183.8
  TopLayer w0.125: IC4.W4@120.175,42.825 v2(120.675,42.325)
  TopLayer w0.127: v1(8.6,42.338) R234.1@9.23,42.338
  SignalLayer1 w0.127: v1(8.6,42.338) 8.6,40.425 9.934,39.091 10.688,39.091 11.822,37.956 11.822,20.458 11.45,20.086 11.45,18.351 17.702,12.099 30.349,12.099 31.933,10.516 44.517,10.516 45.028,10.005 54.469,10.005 56.403,11.94 63.29,11.94 66.788,8.442 87.672,8.442 88.178,8.948 88.78,8.948 88.831,8.998 90.519,8.998 90.57,8.948 118.435,8.948 123.922,14.435 126.415,14.435 126.97,14.99 126.97,18.609 127.173,18.812 127.173,18.986 127.97,19.782 127.97,23.491 125.294,26.166 125.294,38.925 124.591,39.629 123.85,39.629 122.84,40.639 122.503,40.639 122.083,41.059 122.083,42.323 121.681,42.725 121.075,42.725 v2(120.675,42.325)
LED4: IC4.AA4 R153.1 | length 175
  TopLayer w0.125: IC4.AA4@122.175,42.825 v2(122.675,42.325)
  TopLayer w0.127: R153.1@6.03,29.662 v1(6.66,29.662)
  SignalLayer1 w0.127: v1(6.66,29.662) 6.375,29.377 6.375,24.855 7.932,23.298 7.932,22.661 8.6,21.993 8.6,18.787 16.187,11.201 29.999,11.201 31.807,9.393 39.385,9.393 40.469,8.308 42.954,8.308 43.737,9.091 54.847,9.091 56.11,10.354 56.114,10.354 56.924,11.163 60.616,11.163 62.172,9.607 62.172,7.908 62.753,7.327 69.104,7.327 69.666,6.765 73.655,6.765 74.614,7.724 87.969,7.724 88.583,8.338 89.033,8.338 89.083,8.388 90.267,8.388 90.317,8.338 118.688,8.338 124.175,13.825 127.008,13.825 128.58,15.396 128.58,23.743 125.942,26.38 125.942,39.263 124.438,40.767 123.635,40.767 123.074,41.329 123.074,41.926 v2(122.675,42.325)
LED5: IC4.W5 R26.1 | length 167.2
  TopLayer w0.125: IC4.W5@120.175,43.825 v2(120.675,43.325)
  TopLayer w0.127: v1(8.6,25.338) R26.1@9.23,25.338
  SignalLayer1 w0.127: v1(8.6,25.338) 8.6,22.995 9.315,22.28 9.315,19.895 17.397,11.813 30.253,11.813 31.872,10.194 44.384,10.194 44.894,9.684 54.582,9.684 56.562,11.663 63.112,11.663 66.587,8.188 87.777,8.188 88.333,8.744 88.864,8.744 88.915,8.795 90.435,8.795 90.486,8.744 118.519,8.744 124.006,14.231 126.499,14.231 127.173,14.906 127.173,18.525 127.376,18.728 127.376,18.901 128.173,19.698 128.173,23.575 125.498,26.251 125.498,39.01 124.675,39.832 123.935,39.832 122.811,40.956 122.473,40.956 122.287,41.143 122.287,42.407 121.765,42.928 121.072,42.928 v2(120.675,43.325)
LVDS0_N: IC4.W20 J1.3 | length 74.4
  TopLayer w0.095: IC4.W20@120.175,58.825 v2(120.675,59.325)
  BottomLayer w0.095: v2(120.675,59.325) 120.675,58.991 120.731,58.935 120.809,58.935 120.993,59.118 120.993,59.62 121.369,59.996 121.552,59.996 122.171,59.996 122.29,60.115 122.29,60.248 122.409,60.367 122.766,60.367 122.885,60.248 122.885,60.115 123.004,59.996 123.646,59.996 131.304,59.996 132.251,59.05 138.357,59.05 140.355,57.052 141.52,57.052 141.663,57.194 141.663,58.573 142.119,59.03 143.784,59.03 144.066,58.748 144.12,58.694 144.12,57.544 142.044,55.467 142.044,54.885 142.4,54.529 142.903,54.026 143.242,54.026 143.949,54.733 144.57,54.733 144.962,54.341 145.017,54.286 145.017,53.165 145.072,53.11 146.209,53.11 146.44,53.34 146.44,54.817 146.939,55.317 147.698,55.317 150.264,57.883 151.054,57.883 151.916,57.02 151.916,55.535 150.294,53.913 149.282,53.913 149.276,53.919 148.208,53.919 147.855,53.567 147.855,53.069 148.047,52.877 149.565,52.877 149.574,52.886 150.534,52.886 150.617,52.803 150.644,52.777 150.644,52.274 150.135,51.765 148.146,51.765 147.4,51.018 147.4,50.478 148.356,49.522 148.872,49.522 151.552,52.203 153.604,52.203 154.202,52.8 154.202,54.156 154.146,54.211 154.067,54.211 J1.3@153.114,53.258
LVDS0_P: IC4.W19 J1.2 | length 74.9
  TopLayer w0.095: IC4.W19@120.175,57.825 v2(120.675,58.325)
  BottomLayer w0.095: v2(120.675,58.325) 120.675,58.659 120.767,58.751 120.886,58.751 121.176,59.042 121.176,59.544 121.445,59.813 131.228,59.813 132.175,58.866 138.281,58.866 140.278,56.868 141.597,56.868 141.846,57.118 141.846,58.497 142.195,58.846 143.707,58.846 143.936,58.617 143.936,57.62 143.217,56.901 141.86,55.544 141.86,54.809 142.773,53.896 142.827,53.842 143.318,53.842 144.025,54.549 144.493,54.549 144.833,54.21 144.833,53.075 144.983,52.926 146.285,52.926 146.624,53.264 146.624,54.741 147.015,55.133 147.774,55.133 150.34,57.699 150.977,57.699 151.732,56.944 151.732,55.611 150.218,54.097 149.358,54.097 149.352,54.103 148.131,54.103 147.671,53.643 147.671,52.993 147.971,52.694 149.641,52.694 149.65,52.702 150.404,52.702 150.46,52.646 150.46,52.35 150.059,51.948 148.07,51.948 147.216,51.095 147.216,50.402 148.28,49.338 148.948,49.338 151.628,52.019 153.68,52.019 154.386,52.724 154.386,54.345 154.594,54.554 154.594,54.738 J1.2@155.654,55.798
LVDS1_N: IC4.U21 J1.6 | length 81.6
  TopLayer w0.095: IC4.U21@118.175,59.855 117.883,59.855 117.722,60.016 117.722,60.132 117.808,60.218 118.375,60.218 118.784,60.627 118.784,61.294 122.955,65.465 143.264,65.465 143.962,64.767 145.052,63.677 149.798,63.677 150.813,62.663 150.863,62.613 157.079,62.613 157.488,62.204 157.529,62.163 157.529,61.859 157.367,61.697 152.004,61.697 151.643,61.336 151.643,60.889 151.902,60.631 156.196,60.631 156.343,60.484 156.343,60.113 156.029,59.799 152.351,59.799 151.899,59.347 151.899,58.347 152.186,58.06 157.236,58.06 157.48,57.816 157.48,52.5 157.48,51.858 157.361,51.739 156.865,51.739 156.746,51.62 156.746,51.263 156.865,51.144 157.361,51.144 157.48,51.025 157.48,50.655 157.48,50.576 156.51,49.606 154.877,49.606 154.481,50.003 154.481,50.165 154.773,50.457 155.393,50.457 J1.6@155.654,50.718
LVDS1_P: IC4.T21 J1.5 | length 81.6
  TopLayer w0.095: IC4.T21@117.175,59.855 117.466,59.855 117.538,59.927 117.538,60.208 117.732,60.402 118.299,60.402 118.6,60.704 118.6,61.371 122.879,65.649 143.34,65.649 145.128,63.861 149.875,63.861 150.939,62.797 157.155,62.797 157.713,62.239 157.713,61.783 157.443,61.513 152.08,61.513 151.827,61.259 151.827,60.966 151.978,60.815 156.278,60.815 156.476,60.617 156.476,60.612 156.527,60.561 156.527,60.036 156.105,59.615 152.427,59.615 152.083,59.271 152.083,58.424 152.262,58.244 157.313,58.244 157.664,57.892 157.664,50.5 156.586,49.422 154.801,49.422 154.297,49.926 154.297,50.165 154,50.461 153.371,50.461 J1.5@153.114,50.718
LVDS2_N: IC4.W22 J1.9 | length 77.8
  TopLayer w0.095: IC4.W22@120.205,60.825 120.205,60.533 120.366,60.372 120.482,60.372 120.568,60.458 120.568,61.926 123.616,64.973 142.729,64.973 144.508,63.194 149.257,63.194 150.755,61.695 150.755,55.402 150.852,55.305 151.451,55.305 151.655,55.101 151.655,54.572 151.451,54.368 150.035,54.368 149.938,54.271 149.938,53.895 150.035,53.798 151.451,53.798 151.655,53.593 151.655,53.065 151.451,52.86 149.952,52.86 149.855,52.763 149.855,52.387 149.952,52.29 151.451,52.29 151.655,52.085 151.655,51.557 151.451,51.352 149.952,51.352 149.855,51.255 149.855,50.879 149.952,50.782 151.451,50.782 151.655,50.577 151.655,50.049 151.451,49.844 149.952,49.844 149.855,49.747 149.855,49.371 149.952,49.274 151.451,49.274 151.655,49.07 151.655,48.541 151.451,48.336 149.952,48.336 149.855,48.24 149.855,47.863 149.952,47.766 151.451,47.766 151.655,47.562 151.655,47.033 151.451,46.829 149.952,46.829 149.855,46.732 149.855,46.356 149.952,46.259 150.551,46.259 150.755,46.054 150.755,45.688 151.994,44.45 153.518,44.45 154.202,45.134 154.202,46.128 154.464,46.39 154.464,46.635 154.402,46.698 154.174,46.698 J1.9@153.114,45.638
LVDS2_P: IC4.W21 J1.8 | length 78.3
  TopLayer w0.095: IC4.W21@120.175,59.825 120.175,60.086 120.277,60.188 120.558,60.188 120.752,60.382 120.752,61.85 123.692,64.789 142.653,64.789 143.895,63.547 144.432,63.01 149.181,63.01 149.445,62.745 150.571,61.619 150.571,55.326 150.776,55.122 151.374,55.122 151.471,55.025 151.471,54.648 151.374,54.552 149.959,54.552 149.755,54.347 149.755,53.818 149.959,53.614 151.374,53.614 151.471,53.517 151.471,53.141 151.374,53.044 149.876,53.044 149.671,52.839 149.671,52.311 149.876,52.106 151.374,52.106 151.471,52.009 151.471,51.633 151.374,51.536 149.876,51.536 149.671,51.331 149.671,50.803 149.876,50.598 151.374,50.598 151.471,50.501 151.471,50.125 151.374,50.028 149.876,50.028 149.671,49.824 149.671,49.295 149.876,49.09 151.374,49.09 151.471,48.993 151.471,48.617 151.374,48.52 149.876,48.52 149.671,48.316 149.671,47.787 149.876,47.583 151.374,47.583 151.471,47.486 151.471,47.109 151.374,47.013 149.876,47.013 149.671,46.808 149.671,46.279 149.876,46.075 150.474,46.075 150.571,45.978 150.571,45.612 151.917,44.266 153.594,44.266 154.386,45.058 154.386,46.051 154.648,46.314 154.648,46.712 154.594,46.766 154.594,47.118 J1.8@155.654,48.178
LVDS3_N: IC4.T18 J1.12 | length 71
  TopLayer w0.095: IC4.T18@117.175,56.825 v2(117.675,57.325)
  BottomLayer w0.095: v2(117.675,57.325) 117.245,57.755 117.245,61.428 117.515,61.698 119.729,61.698 137.913,61.697 138.978,62.762 138.978,63.376 140.253,64.651 145.055,64.651 145.215,64.491 147.326,62.38 147.38,62.326 147.411,62.326 148.625,61.112 154.496,61.112 157.671,57.938 157.671,49.676 157.017,49.022 157.017,44.679 157.017,44.442 156.96,44.385 156.574,44.385 156.517,44.328 156.517,44.062 156.574,44.005 156.96,44.005 157.017,43.948 157.017,43.815 157.017,42.418 156.585,41.986 154.877,41.986 154.481,42.383 154.481,42.545 154.773,42.837 155.393,42.837 J1.12@155.654,43.098
LVDS3_P: IC4.R18 J1.11 | length 71.3
  TopLayer w0.095: IC4.R18@116.175,56.825 v2(116.675,57.325)
  BottomLayer w0.095: v2(116.675,57.325) 117.061,57.711 117.061,61.504 117.439,61.881 119.805,61.881 137.837,61.881 138.794,62.838 138.794,63.477 140.153,64.835 145.131,64.835 147.456,62.51 147.487,62.51 148.701,61.296 154.572,61.296 157.854,58.014 157.854,49.6 157.201,48.946 157.201,42.342 156.661,41.802 154.801,41.802 154.297,42.306 154.297,42.545 154,42.841 153.371,42.841 J1.11@153.114,43.098
LVDS4_N: IC4.V20 J1.15 | length 70.5
  TopLayer w0.095: IC4.V20@119.175,58.825 v2(119.675,59.325)
  BottomLayer w0.095: v2(119.675,59.325) 119.341,59.325 119.285,59.381 119.285,59.459 119.468,59.643 120.146,59.643 121.054,60.551 138.482,60.551 140.811,62.88 141.559,62.88 142.248,62.191 142.248,61.305 142.357,61.195 143.001,60.551 147.485,60.551 147.99,60.046 149.962,60.046 150.712,59.295 151.455,59.295 152.205,60.046 153.95,60.046 156.928,57.068 156.928,50.477 156.006,49.554 152.596,49.554 151.69,48.648 151.69,40.843 151.69,40.701 151.69,40.447 151.595,40.352 151.409,40.352 151.339,40.282 151.339,40.072 151.409,40.003 151.595,40.003 151.69,39.908 151.69,39.621 152.205,39.106 153.604,39.106 153.866,39.368 154.111,39.368 154.174,39.306 154.174,39.078 J1.15@153.114,38.018
LVDS4_P: IC4.U20 J1.14 | length 70.5
  TopLayer w0.095: IC4.U20@118.175,58.825 v2(118.675,59.325)
  BottomLayer w0.095: v2(118.675,59.325) 119.009,59.325 119.101,59.417 119.101,59.536 119.392,59.826 120.07,59.826 120.978,60.735 138.406,60.735 140.735,63.064 141.636,63.064 142.432,62.267 142.432,61.381 143.077,60.735 147.561,60.735 148.067,60.23 150.038,60.23 150.788,59.479 151.357,59.479 152.108,60.23 154.026,60.23 157.112,57.144 157.112,50.4 156.082,49.37 152.672,49.37 151.874,48.572 151.874,39.697 152.281,39.29 153.527,39.29 153.79,39.552 154.188,39.552 154.242,39.498 154.594,39.498 J1.14@155.654,40.558
LVDS5_N: IC4.R19 J1.18 | length 79.6
  TopLayer w0.095: IC4.R19@116.175,57.825 v2(116.675,58.325)
  BottomLayer w0.095: v2(116.675,58.325) 116.245,58.755 116.245,61.317 117.555,62.627 135.461,62.627 138.041,65.208 145.733,65.208 147.142,63.798 148.681,62.259 154.834,62.259 158.439,58.654 158.439,36.323 157.701,35.586 157.42,35.586 157.398,35.608 157.117,35.608 156.695,35.186 156.695,34.904 156.716,34.882 156.716,34.601 156.482,34.366 154.877,34.366 154.481,34.763 154.481,34.925 154.773,35.217 155.393,35.217 J1.18@155.654,35.478
LVDS5_P: IC4.P19 J1.17 | length 80.4
  TopLayer w0.095: IC4.P19@115.175,57.825 v2(115.675,58.325)
  BottomLayer w0.095: v2(115.675,58.325) 116.061,58.711 116.061,61.393 117.479,62.811 135.385,62.811 137.965,65.392 145.809,65.392 148.758,62.443 154.91,62.443 158.623,58.73 158.623,36.247 156.558,34.182 154.801,34.182 154.297,34.686 154.297,34.925 154,35.221 153.371,35.221 J1.17@153.114,35.478
LVDS6_N: IC4.V19 J1.21 | length 71.8
  TopLayer w0.095: IC4.V19@119.175,57.825 v2(119.675,58.325)
  BottomLayer w0.095: v2(119.675,58.325) 120.061,57.939 122.907,57.939 123.394,57.452 138.404,57.452 150.982,44.874 150.982,38.909 151.041,38.85 151.515,38.85 151.682,38.683 151.682,38.079 151.515,37.912 150.341,37.912 150.282,37.853 150.282,37.401 150.341,37.342 151.515,37.342 151.682,37.175 151.682,36.571 151.515,36.404 150.341,36.404 150.282,36.345 150.282,35.893 150.341,35.834 151.515,35.834 151.682,35.667 151.682,35.063 151.515,34.896 150.341,34.896 150.282,34.837 150.282,34.386 150.341,34.326 151.515,34.326 151.682,34.159 151.682,33.556 151.515,33.389 150.341,33.389 150.282,33.329 150.282,32.878 150.341,32.819 151.515,32.819 151.682,32.652 151.682,32.048 151.515,31.881 150.341,31.881 150.282,31.822 150.282,31.37 150.341,31.311 150.815,31.311 150.982,31.144 150.982,30.741 152.503,29.22 153.487,29.22 154.202,29.935 154.202,30.888 154.464,31.15 154.464,31.395 154.402,31.458 154.174,31.458 J1.21@153.114,30.398
LVDS6_P: IC4.V18 J1.20 | length 72.3
  TopLayer w0.095: IC4.V18@119.175,56.825 v2(119.675,57.325)
  BottomLayer w0.095: v2(119.675,57.325) 120.105,57.755 122.831,57.755 123.193,57.393 123.318,57.268 138.327,57.268 150.798,44.798 150.798,38.833 150.965,38.666 151.439,38.666 151.498,38.607 151.498,38.155 151.439,38.096 150.265,38.096 150.098,37.929 150.098,37.325 150.265,37.158 151.439,37.158 151.498,37.099 151.498,36.647 151.439,36.588 150.265,36.588 150.098,36.421 150.098,35.817 150.265,35.65 151.439,35.65 151.498,35.591 151.498,35.14 151.439,35.08 150.265,35.08 150.098,34.913 150.098,34.309 150.265,34.143 151.439,34.143 151.498,34.083 151.498,33.632 151.439,33.573 150.265,33.573 150.098,33.406 150.098,32.802 150.265,32.635 151.439,32.635 151.498,32.575 151.498,32.124 151.439,32.065 150.265,32.065 150.098,31.898 150.098,31.294 150.265,31.127 150.739,31.127 150.798,31.068 150.798,30.664 152.426,29.036 153.563,29.036 154.386,29.859 154.386,30.811 154.648,31.074 154.648,31.472 154.594,31.526 154.594,31.878 J1.20@155.654,32.938
LVDS7_N: IC4.W17 J1.24 | length 74.6
  TopLayer w0.095: IC4.W17@120.175,55.825 v2(120.675,56.325)
  BottomLayer w0.095: v2(120.675,56.325) 120.341,56.325 120.285,56.381 120.285,56.459 120.468,56.643 130.702,56.643 132.895,54.449 134.415,54.449 138.527,54.449 148.787,44.189 148.787,36.962 148.728,36.903 148.254,36.903 148.087,36.736 148.087,36.132 148.254,35.965 149.428,35.965 149.487,35.906 149.487,35.455 149.428,35.395 148.254,35.395 148.087,35.228 148.087,34.624 148.254,34.457 149.428,34.457 149.487,34.398 149.487,33.947 149.428,33.887 148.254,33.887 148.087,33.721 148.087,33.117 148.254,32.95 149.428,32.95 149.487,32.89 149.487,32.439 149.428,32.38 148.254,32.38 148.087,32.213 148.087,31.609 148.254,31.442 149.428,31.442 149.487,31.383 149.487,30.931 149.428,30.872 148.254,30.872 148.087,30.705 148.087,30.101 148.254,29.934 148.728,29.934 148.787,29.875 148.787,29.472 149.119,29.14 149.355,29.14 149.69,29.475 149.774,29.475 150.093,29.155 150.093,29.072 149.263,28.242 149.263,28.006 149.69,27.579 149.926,27.579 150.756,28.409 150.84,28.409 151.159,28.089 151.159,28.006 150.329,27.175 150.329,26.939 150.756,26.512 150.992,26.512 151.327,26.847 151.411,26.847 151.696,26.562 152.585,26.562 153.968,26.562 154.472,27.066 154.472,27.305 154.768,27.601 155.397,27.601 J1.24@155.654,27.858
LVDS7_P: IC4.V17 J1.23 | length 74.6
  TopLayer w0.095: IC4.V17@119.175,55.825 v2(119.675,56.325)
  BottomLayer w0.095: v2(119.675,56.325) 120.009,56.325 120.101,56.417 120.101,56.536 120.392,56.826 130.778,56.826 132.971,54.633 138.603,54.633 148.971,44.265 148.971,36.886 148.804,36.719 148.33,36.719 148.271,36.66 148.271,36.208 148.33,36.149 149.504,36.149 149.671,35.982 149.671,35.378 149.504,35.211 148.33,35.211 148.271,35.152 148.271,34.701 148.33,34.641 149.504,34.641 149.671,34.474 149.671,33.871 149.504,33.704 148.33,33.704 148.271,33.644 148.271,33.193 148.33,33.134 149.504,33.134 149.671,32.967 149.671,32.363 149.504,32.196 148.33,32.196 148.271,32.137 148.271,31.685 148.33,31.626 149.504,31.626 149.671,31.459 149.671,30.855 149.504,30.688 148.33,30.688 148.271,30.629 148.271,30.177 148.33,30.118 148.804,30.118 148.971,29.951 148.971,29.548 149.195,29.324 149.279,29.324 149.614,29.659 149.85,29.659 150.277,29.232 150.277,28.996 149.447,28.165 149.447,28.082 149.766,27.762 149.85,27.762 150.68,28.592 150.916,28.592 151.343,28.165 151.343,27.929 150.513,27.099 150.513,27.016 150.832,26.696 150.916,26.696 151.251,27.031 151.487,27.031 151.773,26.746 152.585,26.746 153.892,26.746 154.288,27.143 154.288,27.305 153.996,27.597 153.376,27.597 J1.23@153.114,27.858
LVDS8_N: IC4.Y19 J12.3 | length 43.1
  TopLayer w0.095: IC4.Y19@121.175,57.825 121.561,57.439 125.428,57.439 126.181,58.191 126.181,60.909 127.196,61.924 132.477,61.924 133.273,61.127 133.273,60.931 132.437,60.095 132.437,60.051 132.662,59.826 132.705,59.826 133.542,60.662 133.738,60.662 134.071,60.329 134.071,60.134 133.059,59.122 133.059,59.078 133.284,58.853 133.328,58.853 134.339,59.865 134.535,59.865 134.868,59.532 134.868,59.336 133.857,58.324 133.857,58.281 134.082,58.056 134.125,58.056 135.137,59.067 135.333,59.067 135.666,58.734 135.666,58.539 134.654,57.527 134.654,57.483 134.879,57.258 134.923,57.258 135.934,58.27 136.13,58.27 136.463,57.937 136.463,57.741 135.451,56.729 135.451,56.686 135.677,56.461 135.72,56.461 136.732,57.473 136.928,57.473 138.209,56.191 138.209,55.373 137.388,54.552 136.471,54.552 136.208,54.29 135.811,54.29 135.757,54.344 135.404,54.344 J12.3@134.344,53.284
LVDS8_P: IC4.Y18 J12.2 | length 42.3
  TopLayer w0.095: IC4.Y18@121.175,56.825 121.605,57.255 125.505,57.255 126.365,58.115 126.365,60.833 127.272,61.74 132.4,61.74 133.089,61.051 133.089,61.007 132.253,60.171 132.253,59.975 132.586,59.642 132.782,59.642 133.618,60.478 133.662,60.478 133.887,60.253 133.887,60.21 132.875,59.198 132.875,59.002 133.208,58.669 133.404,58.669 134.416,59.681 134.459,59.681 134.684,59.456 134.684,59.412 133.673,58.401 133.673,58.205 134.006,57.872 134.201,57.872 135.213,58.884 135.257,58.884 135.482,58.658 135.482,58.615 134.47,57.603 134.47,57.407 134.803,57.074 134.999,57.074 136.011,58.086 136.054,58.086 136.279,57.861 136.279,57.817 135.268,56.806 135.268,56.61 135.601,56.277 135.796,56.277 136.808,57.289 136.852,57.289 138.025,56.115 138.025,55.449 137.312,54.736 136.395,54.736 136.132,54.474 135.887,54.474 135.824,54.537 135.824,54.764 J12.2@136.884,55.824